# Altium PCB ELF 2 & ELF 2_Lite V1.3.PcbDoc (part 7 of 8)
Units mm, origin at the board's own origin, x right, y up, seen from the top; angles counter-clockwise.
Board outline 120 x 75 mm, 4 copper layers (01 TOP, 02 GND, 03 Signal, 04 BOT), stack 0.603 mm thick; 470 components, 412 nets, 2075 pads, 1565 vias.
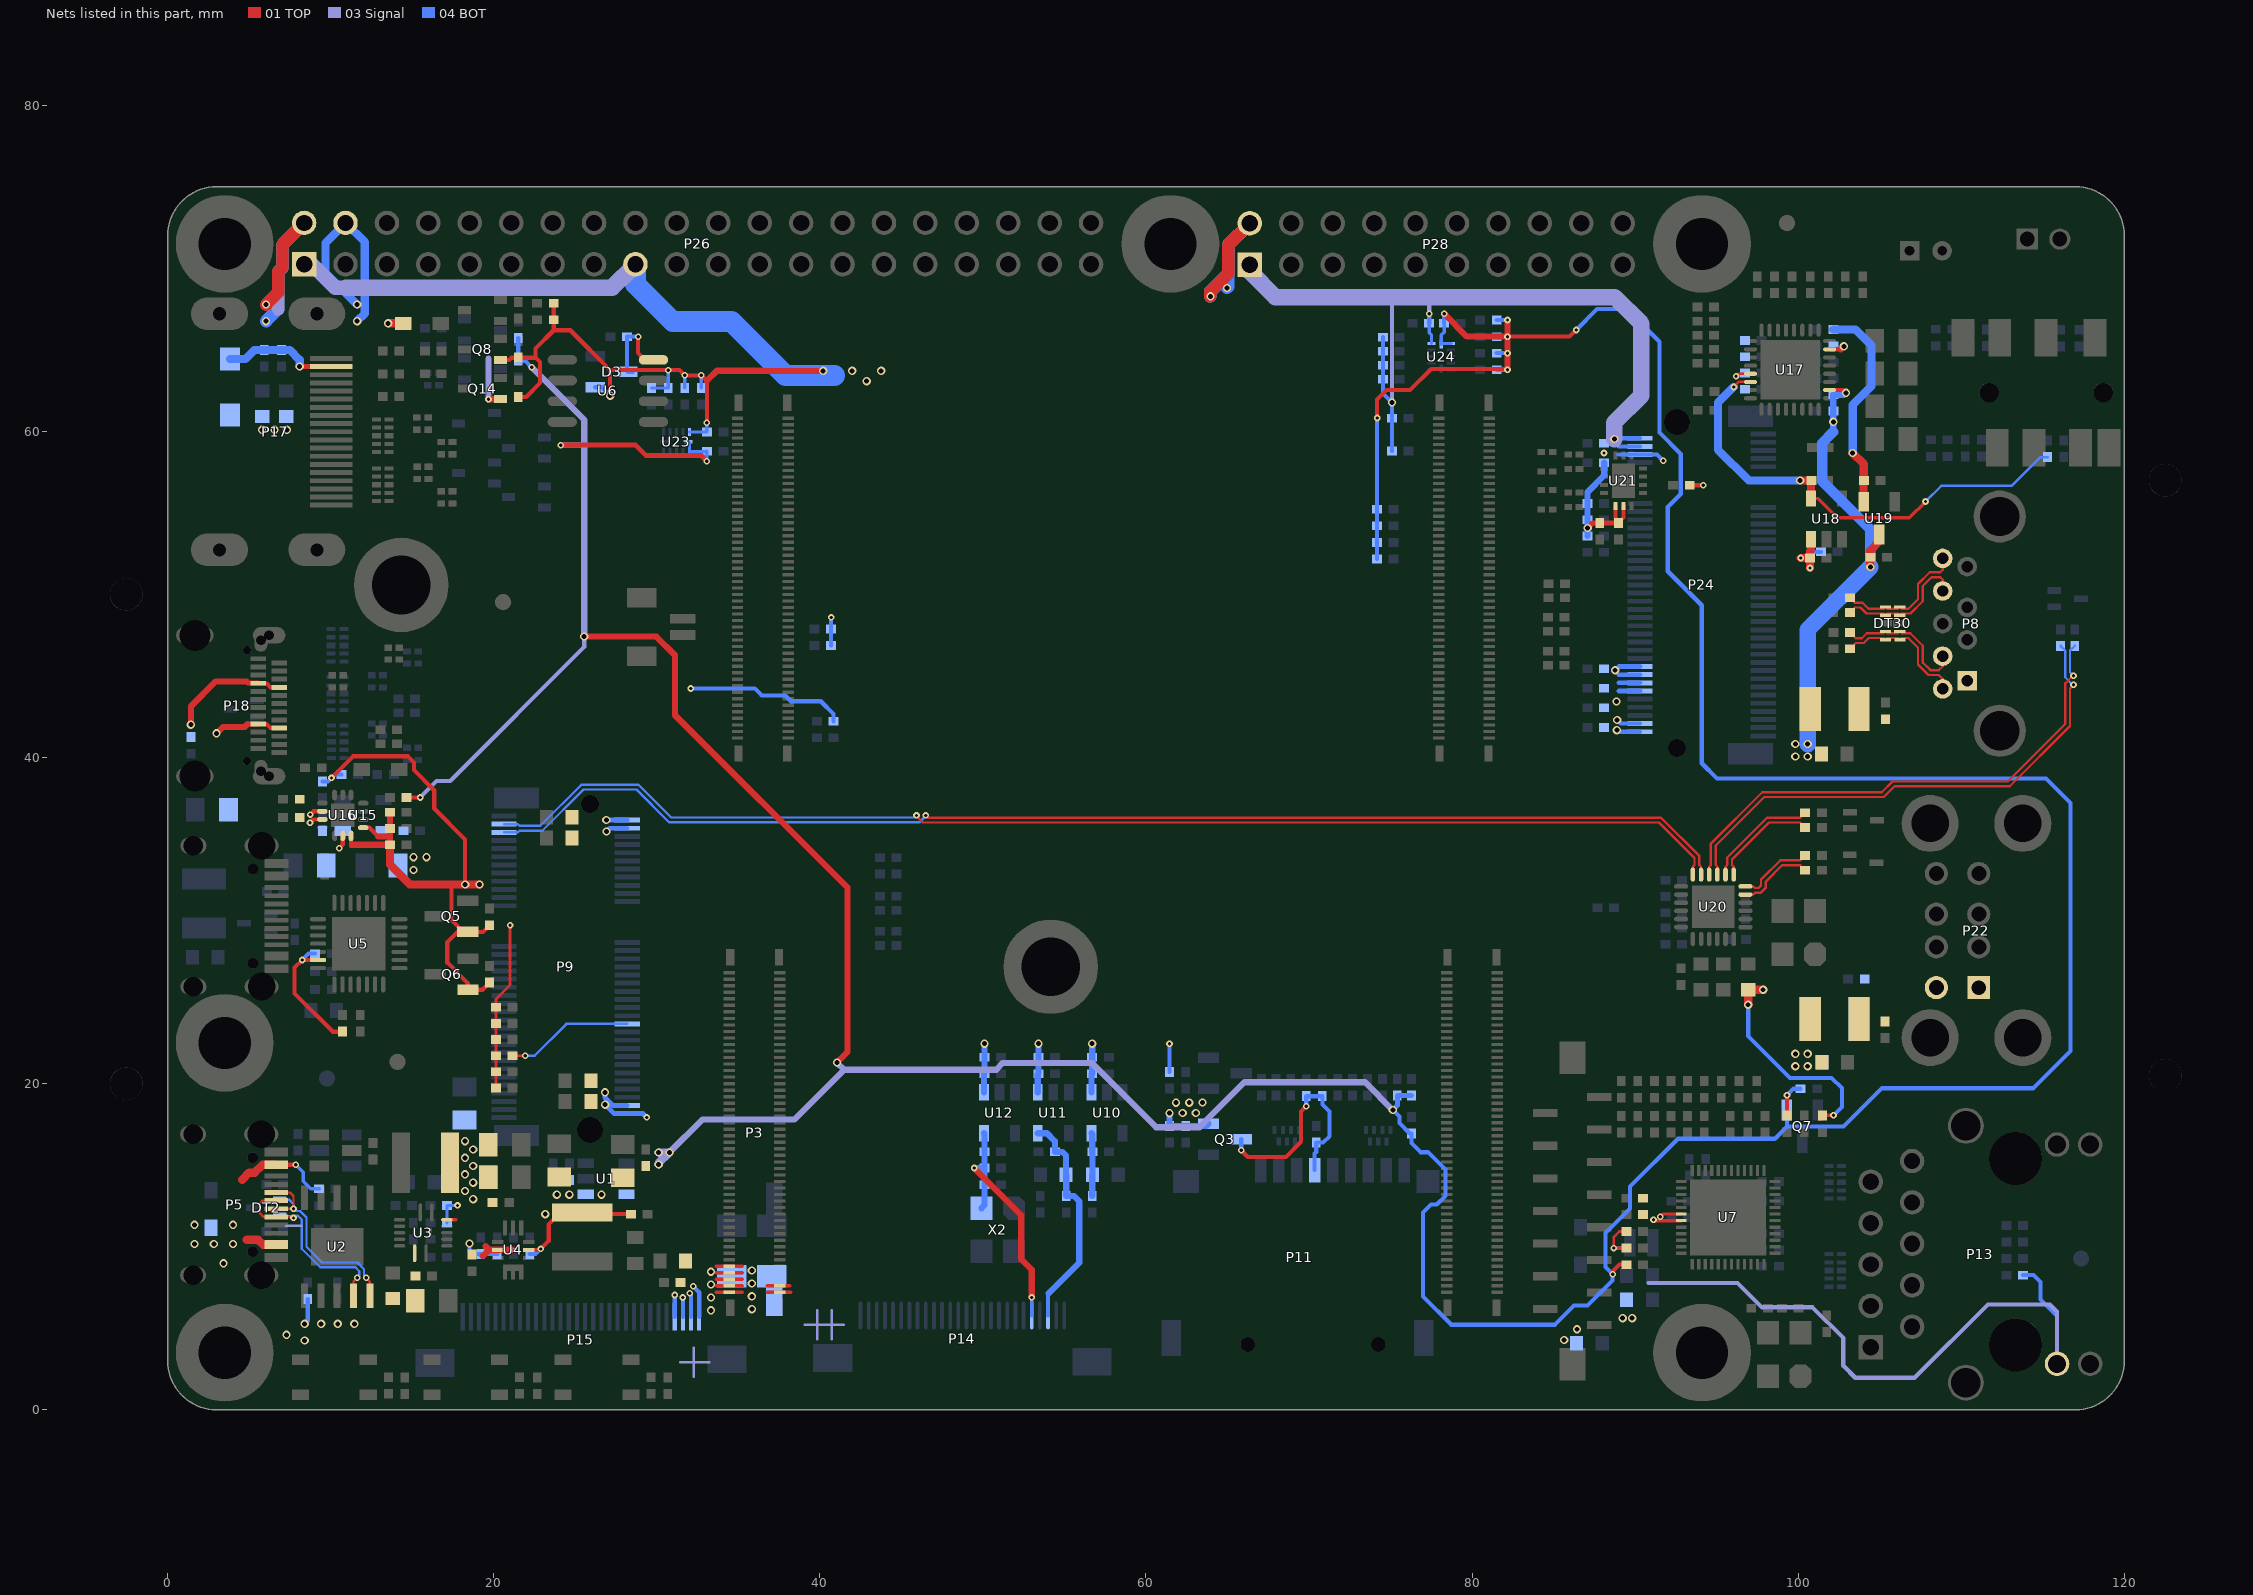
[diagram p8: the nets of this part, all layers, seen from the top]

## Via types
v1: diameter 0.406, hole 0.203, 01 TOP to 04 BOT, tented both sides, 1349 vias
v2: diameter 0.508, hole 0.305, 01 TOP to 04 BOT, tented both sides, 173 vias
v3: diameter 0.6, hole 0.3, 01 TOP to 04 BOT, tented both sides, 34 vias
v4: diameter 0.6, hole 0.3, 01 TOP to 04 BOT, 9 vias

## Nets (pads, with @x,y where several pads share a name; then routed paths per layer and width w, separated by ;. In a path a pad name is that pad's centre, name@x,y a point inside that pad or via, vN(x,y) a via of type N, cw(c..) or ccw(c..) an arc to the next point about the centre after c; other vN are vias at no path point) (continued)
USB3_SSRX_R_N: DT30.5 DT30.6 P8.5 R148.2 | length 8.4
  01 TOP w0.142: R148.2@103.163,49.792 103.466,49.489 103.944,49.489 104.313,49.121 105.241,49.121 DT30.6@105.343,49.224 105.446,49.121 106.122,49.121 DT30.5@106.224,49.224 106.327,49.121 106.766,49.121 107.345,49.701 107.345,50.642 108.061,51.357 108.7,51.357 108.86,51.517 P8.5@108.86,52.21
USB3_SSRX_R_P: DT30.4 DT30.7 P8.6 R152.2 | length 8.4
  01 TOP w0.142: R152.2@103.163,48.892 103.466,49.195 103.822,49.195 104.191,48.826 105.241,48.826 DT30.7@105.343,48.723 105.446,48.826 106.122,48.826 DT30.4@106.224,48.723 106.327,48.826 106.888,48.826 107.64,49.579 107.64,50.52 108.183,51.063 108.7,51.063 108.86,50.903 P8.6@108.86,50.21
USB3_SSTX_T_N: C132.2 DT30.2 DT30.9 P8.8 | length 8.4
  01 TOP w0.142: C132.2@103.168,47.665 103.521,47.312 103.891,47.312 104.2,47.621 105.241,47.621 DT30.9@105.343,47.724 105.446,47.621 106.122,47.621 DT30.2@106.224,47.723 106.327,47.621 106.867,47.621 107.64,46.848 107.64,45.82 108.103,45.357 108.62,45.357 108.86,45.597 P8.8@108.86,46.21
USB3_SSTX_T_P: C133.2 DT30.1 DT30.10 P8.9 | length 8.4
  01 TOP w0.142: C133.2@103.168,46.665 103.521,47.017 104.013,47.017 104.322,47.326 105.241,47.326 DT30.10@105.344,47.223 105.446,47.326 106.122,47.326 DT30.1@106.225,47.223 106.327,47.326 106.745,47.326 107.345,46.726 107.345,45.698 107.981,45.063 108.62,45.063 108.86,44.823 P8.9@108.86,44.21
USB22: DT26.2 F3.1 P22.1
USB23: DT27.2 F4.1 P22.5
USB30: DT31.2 F5.1 P8.1
USB_D1_N: P9.5 U20.11 | length 77.6
  01 TOP w0.142: v1(46.485,36.449) 46.622,36.311 91.579,36.311 93.935,33.955 93.935,33.403 94.038,33.301 U20.11@94.038,32.82
  04 BOT w0.142: P9.5@20.629,35.411 21.48,35.411 21.582,35.514 22.976,35.514 25.496,38.034 28.747,38.034 30.76,36.02 46.102,36.02 46.485,36.404 v1(46.485,36.449)
USB_D1_P: P9.3 U20.12 | length 77.2
  01 TOP w0.142: v1(45.926,36.449) 45.926,36.404 46.314,36.017 91.457,36.017 93.64,33.833 93.64,33.403 93.538,33.301 U20.12@93.538,32.82
  04 BOT w0.142: P9.3@20.629,35.911 21.48,35.911 21.582,35.809 22.854,35.809 25.374,38.328 28.869,38.328 30.882,36.315 45.793,36.315 v1(45.926,36.449)
USB_D2_N: R146.1 U20.9 | length 32
  01 TOP w0.142: U20.9@95.038,32.82 95.038,33.301 94.935,33.403 94.935,34.599 97.912,37.575 105.245,37.575 105.906,38.236 112.975,38.236 116.667,41.927 116.667,44.238 v1(116.883,44.454)
  04 BOT w0.142: R146.1@116.088,46.845 116.372,46.561 116.372,44.92 116.838,44.454 v1(116.883,44.454)
USB_D2_P: R147.1 U20.10 | length 32
  01 TOP w0.142: U20.10@94.538,32.82 94.538,33.301 94.64,33.403 94.64,34.721 97.79,37.87 105.123,37.87 105.783,38.53 112.853,38.53 116.372,42.049 116.372,44.547 116.838,45.013 v1(116.883,45.013)
  04 BOT w0.142: v1(116.883,45.013) 116.667,45.229 116.667,46.561 R147.1@116.951,46.845
USB_D3_N: R138.1 U20.7 | length 6.5
  01 TOP w0.142: U20.7@96.038,32.82 96.038,33.301 95.935,33.403 95.935,33.744 98.204,36.013 100.124,36.013 R138.1@100.426,35.71
USB_D3_P: R139.1 U20.8 | length 7
  01 TOP w0.142: U20.8@95.538,32.82 95.538,33.301 95.64,33.403 95.64,33.866 98.082,36.308 100.124,36.308 R139.1@100.426,36.61
USB_D4_N: R143.1 U20.5 | length 4.8
  01 TOP w0.142: U20.5@96.763,31.594 97.244,31.594 97.347,31.697 97.686,31.697 98.015,32.025 98.015,32.4 99.011,33.397 100.124,33.397 R143.1@100.426,33.094
USB_D4_P: R144.1 U20.6 | length 4.8
  01 TOP w0.142: U20.6@96.763,32.094 97.244,32.094 97.347,31.992 97.564,31.992 97.72,32.147 97.72,32.522 98.889,33.691 100.124,33.691 R144.1@100.426,33.994
USB_N: DT2.1 P5.A7 P5.B7 U2.5 | length 12.9
  01 TOP w0.142: P5.A7@6.658,12.325 7.714,12.325 v1(7.716,12.323) 7.716,13.117 7.509,13.325 P5.B7@6.658,13.325 ; v1(12.179,8.086) 12.4,7.865 U2.5@12.4,7
  04 BOT w0.142: DT2.1@6.878,12.887 7.437,12.887 7.716,12.607 v1(7.716,12.323) 7.848,12.191 8.118,12.191 8.517,11.792 8.517,9.996 9.485,9.028 11.638,9.028 12.047,8.618 12.047,8.218 v1(12.179,8.086)
USB_P: DT2.2 P5.A6 P5.B6 U2.4 | length 12.9
  01 TOP w0.142: P5.A6@6.658,12.825 5.826,12.825 5.659,12.658 5.659,12.046 5.88,11.825 P5.B6@6.658,11.825 7.655,11.825 v1(7.716,11.764) ; U2.4@11.4,7 11.4,7.865 v1(11.621,8.086)
  04 BOT w0.142: DT2.2@6.878,11.887 7.594,11.887 v1(7.716,11.764) 7.848,11.896 7.996,11.896 8.222,11.67 8.222,9.874 9.363,8.733 11.516,8.733 11.753,8.496 11.753,8.218 v1(11.621,8.086)
VBUS_TYPEC0: C79.2 C80.2 C81.2 DT17.2 P18.A4 P18.A9 P18.B4 P18.B9 U15.1 U16.2 | length 12.4
  01 TOP w0.254: P18.B4@5.545,42.055 6.07,42.055 6.32,41.805 P18.A9@6.845,41.805 ; P18.B9@5.545,44.555 5.568,44.532 6.088,44.532 6.315,44.305 P18.A4@6.845,44.305 ; v1(10.526,34.438) 10.744,34.656 U16.2@10.744,35.2
  01 TOP w0.305: 4.817,44.666 4.928,44.555 P18.B9@5.548,44.555 ; 4.913,42.055 P18.B4@5.548,42.055
  01 TOP w0.381: v2(1.427,42.011) 1.427,43.128 2.965,44.666 3.805,44.666 3.818,44.654 4.658,44.654 4.671,44.666 4.817,44.666 ; v2(3.004,41.479) 3.401,41.877 4.735,41.877 4.913,42.055
VCC1V2_CAM: C54.2 C59.2 FB4.1 U10.5 | length 3.9
  04 BOT w0.381: U10.5@56.659,16.963 56.709,16.913 C54.2@56.709,15.813 56.722,15.801 FB4.1@56.722,14.413 56.709,14.401 C59.2@56.709,13.113
VCC1V8_CAM: C50.2 C56.2 C62.2 P14.22 U12.5 X2.4 | length 15.8
  01 TOP w0.381: v1(49.459,14.822) 52.354,11.927 52.354,9.219 52.991,8.582 v1(52.991,6.889)
  04 BOT w0.229: P14.22@52.991,5.78 v1(52.991,6.889)
  04 BOT w0.381: v1(49.459,14.822) C56.2@50.094,14.822 ; X2.4@49.907,12.363 50.094,12.55 C50.2@50.094,13.806 C56.2@50.094,14.822 ; U12.5@50.059,16.963 50.101,16.921 C62.2@50.101,15.813 50.094,15.806 C56.2@50.094,14.822
VCC2V8_CAM: C57.2 C58.2 FB3.1 P14.24 U11.5 | length 13.9
  04 BOT w0.229: P14.24@53.991,5.78 53.991,7.101 54.032,7.141
  04 BOT w0.381: U11.5@53.359,16.963 53.929,16.963 54.417,16.475 C57.2@54.417,15.813 54.868,15.813 55.097,15.585 FB3.1@55.097,14.413 55.109,14.401 C58.2@55.109,13.113 55.574,13.113 55.911,12.777 55.911,9.02 54.032,7.141
VCC5V_HDMI_TX0: C76.2 D7.2 DT14.2 P17.18 | length 7.1
  01 TOP w0.305: v2(8.099,63.975) P17.18@10.038,63.975
  04 BOT w0.508: D7.2@3.826,64.44 4.771,64.44 5.315,64.984 C76.2@5.926,64.984 6.968,64.984 DT14.2@6.976,64.992 7.491,64.992 8.099,64.384 v2(8.099,63.975)
VCC12V_DCIN: C1.2 C2.2 C9.2 C10.2 C11.2 C141.1 DT1.2 P3.91 P3.93 P3.95 P3.97 P3.98 P3.99 P3.100 P5.A4/B9 P5.B4/A9 R16.1 R19.2 U3.1 | length 20.4
  01 TOP w0.203: 33.653,7.2 P3.99@34.45,7.2 35.247,7.2 ; 33.653,7.6 P3.97@34.45,7.6 35.247,7.6 ; 33.653,8 P3.95@34.45,8 35.247,8 ; 33.653,8.4 P3.93@34.45,8.4 35.247,8.4 ; 33.653,8.8 P3.91@34.45,8.8 35.247,8.8 ; 36.753,7.2 P3.100@37.55,7.2 38.21,7.2 ; 36.753,7.6 P3.98@37.55,7.6 38.154,7.6
  01 TOP w0.254: P5.A4/B9@6.658,15.025 v1(7.864,15.025)
  01 TOP w0.508: 4.58,14.113 5.005,14.538 5.337,14.538 5.825,15.025 P5.A4/B9@6.658,15.025 ; 4.847,10.424 5.556,10.424 5.855,10.125 P5.B4/A9@6.658,10.125
  04 BOT w0.203: v1(7.864,15.025) 8.322,14.567 8.322,14.014 8.788,13.547 R19.2@9.291,13.547
  04 BOT w0.254: v2(8.402,5.267) 8.598,5.462 R16.1@8.598,6.785
  other v2: 8.402,4.251 7.29,4.597 9.418,5.267 10.434,5.267 11.45,5.267 33.326,6.101 35.824,6.172 33.326,6.888 35.824,6.959 33.326,7.675 35.824,7.747 33.326,8.463 35.824,8.534 3.429,8.98 1.651,10.16 2.831,10.16 4.011,10.16 1.651,11.34 4.011,11.34
VCC_1V8: C6.2 C150.2 C152.2 Q7.1 R3.1 R4.1 R9.1 R10.1 R11.1 R12.1 R45.1 R70.1 R74.2 R75.1 R96.1 R97.1 R113.2 R182.1 R184.1 R186.1 R188.1 U1.5 U23.1 U23.12 U24.1 U24.12 | length 316.9
  01 TOP w0.254: R113.2@14.657,37.55 v1(15.489,37.55) ; v1(74.173,60.824) 74.173,61.951 74.757,62.535 76.2,62.535 77.495,63.83 82.118,63.83 v1(82.169,63.779) ; v1(82.169,65.811) 85.979,65.811 v1(86.385,66.218) ; v1(88.615,8.315) 88.615,8.478 89.036,8.899 R74.2@89.454,8.899 ; R70.1@99.306,18.052 99.306,19.285 v1(99.309,19.287)
  01 TOP w0.305: v1(24.105,59.157) 28.701,59.157 29.347,58.51 32.736,58.51 v1(33.071,58.175)
  01 TOP w0.381: v2(25.547,47.414) 29.976,47.414 31.115,46.275 31.115,42.596 41.7,32.01 41.7,21.947 v2(41.046,21.293) ; v1(78.283,67.212) 79.683,65.811 v1(82.169,65.811) ; v1(82.169,63.779) v1(82.169,64.795) v1(82.169,65.811) ; v1(82.169,66.827) v1(82.169,65.811)
  03 Signal w0.254: v1(15.489,37.55) 16.498,38.559 17.334,38.559 25.547,46.772 v2(25.547,47.414)
  03 Signal w0.305: v1(24.105,59.157) 25.547,59.157
  03 Signal w0.381: v1(22.323,63.928) 25.547,60.704 25.547,59.157 v2(25.547,47.414) ; v2(30.777,15.778) 32.798,17.799 38.433,17.799 41.487,20.853 ; v2(41.046,21.293) 41.487,20.853 ; v2(75.139,18.38) 73.434,20.086 66.037,20.086 63.277,17.325 60.616,17.325 56.674,21.268 51.226,21.268 50.811,20.853 41.487,20.853
  03 Signal w0.508: v2(30.117,15.041) 30.117,15.117 v2(30.777,15.778) v2(30.117,15.778)
  04 BOT w0.203: U23.12@31.953,59.36 32.003,59.31 U23.1@32.003,58.76 33.043,58.76 C150.2@33.071,58.788 v1(33.071,58.175) ; C152.2@78.283,66.624 78.283,66.082 78.111,65.911 U24.12@78.111,65.336 78.161,65.386 U24.1@78.711,65.386
  04 BOT w0.254: R96.1@21.501,65.718 R97.1@21.501,64.334 21.917,64.334 v1(22.323,63.928) ; R4.1@74.173,52.171 R3.1@74.173,53.187 R12.1@74.173,54.204 R11.1@74.173,55.22 v1(74.173,60.824) ; v2(75.139,18.38) 75.538,17.981 75.538,17.578 76.175,16.942 R10.1@76.276,16.942 76.276,16.36 76.841,15.795 77.298,15.795 78.363,14.73 78.363,13.12 77.832,12.589 77.477,12.589 76.982,12.094 76.982,6.955 78.721,5.216 85.075,5.216 86.244,6.384 87.066,6.384 88.615,7.934 v1(88.615,8.315) 88.184,8.746 88.184,10.852 89.682,12.351 89.682,13.687 92.616,16.62 98.563,16.62 99.306,17.364 ; C152.2@78.283,66.624 v1(78.283,67.212) ; R188.1@81.509,63.779 v1(82.169,63.779) ; R186.1@81.509,64.795 v1(82.169,64.795) ; R184.1@81.509,65.811 v1(82.169,65.811) ; R182.1@81.509,66.827 v1(82.169,66.827) ; v1(86.385,66.218) 87.663,67.495 89.49,67.495 91.49,65.495 91.49,59.921 92.792,58.619 92.792,56.165 91.995,55.368 91.995,51.423 94.082,49.337 94.082,39.649 95.025,38.706 115.192,38.706 116.693,37.205 116.693,21.998 114.414,19.719 105.125,19.719 102.77,17.364 99.306,17.364 ; R75.1@100.148,19.688 99.71,19.688 v1(99.309,19.287) 99.306,19.285 Q7.1@99.306,18.388 99.306,17.364
  04 BOT w0.305: v2(75.139,18.38) 75.413,18.654 R45.1@75.413,19.279 R9.1@76.276,19.279
VCC_1V8_CODEC: C98.2 C99.2 C100.2 C101.2 C116.2 R127.2 U17.13 U17.14 U18.5 | length 30.5
  01 TOP w0.156: v1(96.038,62.723) 96.348,63.032 U17.14@97.072,63.032 ; v1(96.186,63.383) 96.336,63.532 U17.13@97.072,63.532
  01 TOP w0.203: U18.5@100.778,55.882 101.215,55.882 102.402,54.695 106.802,54.695 v1(107.805,55.698)
  01 TOP w0.254: U18.5@100.775,55.879 U18.5@100.778,55.882
  01 TOP w0.508: v2(100.121,56.982) C116.2@100.82,56.982 100.778,56.94 U18.5@100.778,55.882
  04 BOT w0.156: v1(107.805,55.698) 108.77,56.663 113.089,56.663 114.846,58.421 R127.2@115.288,58.421
  04 BOT w0.508: v1(96.038,62.723) 95.082,61.767 95.082,58.864 96.965,56.982 v2(100.121,56.982)
VCC_3V3: C4.2 C5.2 C21.2 C23.2 C24.2 C25.2 C28.2 C36.2 C37.2 C53.2 C55.2 C61.2 C92.2 C93.2 C110.2 C115.2 C130.2 C131.2 C136.2 C137.2 C138.2 C139.2 C142.2 C143.2 C151.2 C153.2 D3.1 FB1.1 FB5.1 FB6.1 L2.2 P9.2 P9.4 P9.72 P9.74 P13.11 P24.2 P24.4 P24.12 P24.14 P24.16 P24.18 P24.70 P24.72 P24.74 P26.1 P26.17 P28.1 Q3.2 Q5.1 Q6.1 Q8.1 R1.1 R2.1 R5.1 R6.1 R7.1 R8.1 R13.2 R14.2 R15.1 R20.1 R28.1 R29.1 R33.1 R36.1 R47.1 R48.1 R52.2 R68.1 R69.1 R71.2 R78.1 R79.1 R80.1 R81.1 R83.1 R84.1 R94.1 R95.1 R101.1 R102.2 R114.2 R115.2 R125.1 R149.1 R150.1 R151.1 R155.1 R167.1 R180.2 R181.2 R183.2 R185.2 R187.2 R189.2 U1.1 U4.2 U7.30 U7.31 U10.1 U11.1 U12.1 U16.3 U16.4 U18.1 U21.12 U21.13 U23.11 U24.11 | length 296
  01 TOP w0.156: v1(88.692,9.915) 88.692,10.601 89.022,10.931 R69.1@89.454,10.931
  01 TOP w0.178: R20.1@20.137,19.73 R8.1@20.137,20.72 R7.1@20.137,21.711 R95.1@20.137,22.701 R155.1@20.137,23.692 20.137,25.18 21.001,26.044 v1(21.001,29.714)
  01 TOP w0.203: v1(88.692,9.915) R52.2@89.454,9.915 ; v1(91.122,11.646) 91.168,11.6 U7.31@92.824,11.6 ; v1(91.543,11.839) 91.704,12 U7.30@92.824,12 ; R68.1@101.49,18.052 v1(102.163,18.052)
  01 TOP w0.241: U21.12@88.781,55.422 88.781,54.688 88.976,54.493 C143.2@88.976,54.416 ; C143.2@88.976,54.381 C143.2@88.976,54.416 ; U21.13@89.281,55.422 89.281,54.721 C143.2@88.976,54.416
  01 TOP w0.254: v1(10.051,38.748) 11.376,40.073 14.732,40.073 15.108,39.697 15.108,39.233 16.352,37.989 16.352,36.865 18.246,34.97 v2(18.246,32.216) ; 11.244,34.579 U16.3@11.244,35.2 ; U16.4@11.994,35.7 12.364,35.7 12.914,35.15 ; 17.372,32.216 17.419,32.168 17.419,30.032 Q5.1@18.147,29.303 ; R48.1@19.743,26.196 19.305,25.758 Q6.1@18.415,25.758 18.415,26.153 17.153,27.415 17.153,28.673 17.783,29.303 Q5.1@18.147,29.303 ; R47.1@19.743,29.714 19.333,29.303 Q5.1@18.406,29.303 Q5.1@18.147,29.303 ; Q8.1@20.401,64.376 20.947,64.376 21.089,64.518 R81.1@21.501,64.518 22.566,64.518 ; R94.1@21.501,62.118 21.992,62.118 22.831,62.957 22.831,64.253 22.566,64.518 ; U4.2@22.135,9.8 22.816,9.8 v1(22.88,9.864) 23.371,10.355 23.371,11.365 24.106,12.1 L2.2@25.435,12.1 25.537,11.998 R28.1@28.417,11.998 ; R83.1@23.681,67.857 R83.1@23.681,67.857 R84.1@23.68,66.839 23.68,66.2 ; v2(27.14,62.192) 27.14,63.754 ; v1(33.071,60.528) 33.071,63.092 v1(32.727,63.436) v1(31.711,63.436) 31.393,63.754 v1(30.709,63.754) 27.14,63.754 ; C143.2@88.976,54.381 C143.2@89.002,54.381 ; R167.1@93.345,56.693 v1(94.183,56.693) ; 22.566,64.518 22.566,65.086 23.68,66.2 ; 23.68,66.2 24.694,66.2 27.14,63.754
  01 TOP w0.305: v2(87.084,54.08) 87.385,54.381 C142.2@87.833,54.381 C143.2@88.976,54.381
  01 TOP w0.381: 11.315,34.65 C92.2@13.641,34.65 13.641,35.15 ; 12.914,35.15 13.641,35.15 ; R114.2@13.641,36.65 C93.2@13.641,35.65 13.641,35.15 ; 33.071,63.092 33.691,63.712 v2(40.203,63.712)
  01 TOP w0.508: C92.2@13.641,34.65 13.641,33.429 14.854,32.216 17.372,32.216 v2(18.246,32.216) v2(19.121,32.216) ; v2(96.929,24.838) FB6.1@96.929,25.757 v2(97.848,25.757) ; v1(100.161,52.232) C115.2@100.72,52.232 ; v1(100.72,51.622) C115.2@100.72,52.232 ; U18.1@100.778,53.382 100.778,52.724 100.72,52.666 C115.2@100.72,52.232
  03 Signal w0.203: v1(88.692,9.915) 89.387,9.915
  03 Signal w0.254: v2(75.087,61.769) 75.087,68.238 ; v1(77.368,67.212) 77.368,68.204 ; 90.825,7.781 96.279,7.781 97.777,6.283 100.884,6.283 102.763,4.403 102.763,2.697 103.495,1.965 107.132,1.965 111.628,6.46 115.438,6.46 115.87,6.028 P13.11@115.87,2.815
  03 Signal w0.889: P26.1@8.37,70.243 8.851,70.243 10.279,68.816 10.917,68.816
  03 Signal w1.016: 10.917,68.816 27.263,68.816 P26.17@28.69,70.243 ; P28.1@66.37,70.217 66.37,69.798 67.93,68.238 75.087,68.238 88.747,68.238 90.376,66.609 90.376,62.199 88.717,60.54 v2(88.717,59.534)
  04 BOT w0.203: R181.2@29.679,62.662 R180.2@30.695,62.662 v1@30.695,63.741 ; R14.2@31.711,62.662 v1(31.711,63.436) ; U23.11@32.003,59.96 33.067,59.96 C151.2@33.071,59.956 v1(33.071,60.528) ; R13.2@32.727,62.662 v1(32.727,63.436) ; C153.2@77.368,66.624 77.368,66.034 77.511,65.891 U24.11@77.511,65.386
  04 BOT w0.254: R102.2@9.494,38.533 9.836,38.533 v1(10.051,38.748) 10.266,38.963 R101.1@10.673,38.963 ; R29.1@22.212,9.547 22.563,9.547 v1(22.88,9.864) ; D3.1@26.229,62.702 26.629,62.702 v2(27.14,62.192) ; R6.1@40.691,46.863 R5.1@40.691,47.879 v1(40.691,48.59) ; R36.1@61.441,20.708 v1(61.441,22.454) ; R183.2@74.539,65.78 R185.2@74.539,64.917 R187.2@74.539,64.053 R189.2@74.539,63.19 74.539,62.317 v2(75.087,61.769) R2.1@75.087,60.8 R1.1@75.087,58.8 ; C153.2@77.368,66.624 v1(77.368,67.212) ; v2(88.873,41.675) 88.969,41.58 P24.2@90.3,41.58 ; v2(88.895,42.3) 89.115,42.08 P24.4@90.3,42.08 ; 88.991,58.58 P24.70@90.3,58.58 91.331,58.58 v1(91.719,58.191) ; 88.991,59.08 P24.72@90.3,59.08 ; 88.991,59.58 P24.74@90.3,59.58 ; v2(96.929,24.838) 96.929,22.911 99.49,20.351 102.044,20.351 102.672,19.723 102.672,18.561 v1(102.163,18.052) ; v1(100.72,51.622) 100.72,52.35 100.978,52.609 R125.1@101.384,52.609 ; R71.2@113.792,8.255 114.427,8.255 114.846,7.836 114.846,6.765 115.87,5.741 P13.11@115.87,2.815
  04 BOT w0.292: 88.991,44.08 P24.12@90.3,44.08 ; 88.991,44.58 P24.14@90.3,44.58 ; 88.991,45.08 P24.16@90.3,45.08 ; 88.991,45.58 P24.18@90.3,45.58
  04 BOT w0.305: v2(26.817,19.465) 26.809,19.457 26.809,19.153 27.301,18.661 P9.72@28.179,18.661 ; v2(26.836,18.709) 27.384,18.161 P9.74@28.179,18.161 29.15,18.161 v1(29.383,17.929) ; v2(26.906,36.161) P9.2@28.179,36.161 ; v2(26.919,35.467) 27.113,35.661 P9.4@28.179,35.661
  04 BOT w0.381: U12.1@50.059,19.463 50.059,20.571 C61.2@50.101,20.613 R80.1@50.101,21.613 v2(50.101,22.45) ; U11.1@53.359,19.463 53.359,20.571 C55.2@53.401,20.613 R79.1@53.401,21.613 v2(53.401,22.45) ; U10.1@56.659,19.463 56.659,20.571 C53.2@56.701,20.613 R78.1@56.701,21.613 v2(56.701,22.45) ; v2(61.441,18.191) R33.1@61.441,17.408 C28.2@62.441,17.408 63.699,17.408 Q3.2@63.841,17.55 ; R149.1@87.084,53.58 v2(87.084,54.08) R150.1@87.084,54.58 R151.1@87.084,55.58 87.084,56.281 88.1,57.297 C131.2@88.1,58.08
  04 BOT w1.27: P26.17@28.69,70.243 28.69,69.026 30.979,66.736 34.576,66.736 37.888,63.424 40.894,63.424
  other v1: 88.087,58.674
  other v2: 85.644,4.276 86.431,4.936 89.232,5.614 89.816,5.614 23.16,11.998 23.871,13.191 24.633,13.191 26.614,13.191 62.25,18.195 63.059,18.199 61.844,18.83 62.653,18.834 63.462,18.838 88.851,43.428 88.769,45.35 42.87,63.077 41.981,63.712 43.759,63.712
VCC_3V3_CODEC: C96.2 C97.2 C118.2 U17.31 U19.2 | length 14
  01 TOP w0.254: U17.31@101.922,65.032 102.609,65.032
  01 TOP w0.381: 102.609,65.032 v2(102.791,65.215)
  01 TOP w0.508: v2(103.336,58.673) 104.02,57.99 C118.2@104.02,56.982 104.006,56.969 U19.2@104.006,55.677
  04 BOT w0.508: C96.2@102.149,66.247 103.508,66.247 104.49,65.265 104.49,62.772 103.336,61.618 v2(103.336,58.673)
VCC_3V3_SD: C29.2 C30.2 DT7.2 P11.4 Q3.3 | length 14.1
  01 TOP w0.254: v1(65.841,15.91) 66.24,15.511 68.583,15.511 69.508,16.436 69.508,18.301 v1(69.825,18.618)
  04 BOT w0.254: v1(65.841,15.91) Q3.3@65.841,16.6 ; v1(69.825,18.618) C30.2@69.825,19.228 C29.2@70.815,19.228 70.815,18.72 71.243,18.292 71.243,16.769 70.865,16.392 DT7.2@70.441,16.392 70.441,15.816 70.341,15.716 P11.4@70.341,14.701
VCC_5V: C3.2 C13.2 C14.2 C15.2 C16.2 C18.1 C22.2 C51.2 C52.2 C74.2 C75.2 C77.1 C78.1 C90.2 C91.2 C94.2 C95.2 C117.2 C125.2 C127.2 C129.2 D5.1 D7.1 F3.2 F4.2 F5.2 L1.2 P15.1 P15.2 P15.3 P15.4 P26.2 P26.4 P28.2 Q14.1 R22.2 R30.1 R31.1 R136.1 U3.7 U4.8 U15.5 U16.12 U16.13 U17.26 U19.3 | length 115
  01 TOP w0.198: U3.7@17.125,11.65 17.665,11.65
  01 TOP w0.254: v1(8.732,35.999) 8.933,36.2 U16.13@9.494,36.2 ; v1(8.74,36.5) 8.94,36.7 U16.12@9.494,36.7 ; U17.26@101.922,62.532 102.752,62.532 v2(102.924,62.361)
  01 TOP w0.381: 19.319,9.427 19.71,9.817 ; 19.502,10.025 19.71,9.817 ; v1(19.678,61.976) Q14.1@20.401,61.976 ; U4.8@21.306,9.817 19.71,9.817
  01 TOP w0.508: v2(13.529,66.626) D5.1@14.451,66.626 ; v2(104.42,51.681) C117.2@104.42,52.282 104.42,52.701 104.956,53.238 U19.3@104.956,53.677
  01 TOP w0.762: v2(6.04,67.776) 6.781,68.517 6.781,69.783 7.043,70.045 7.043,71.456 P26.2@8.37,72.783 ; v2(63.952,68.284) 63.952,68.576 65.033,69.657 65.033,71.42 P28.2@66.37,72.757
  03 Signal w0.156: 7.285,11.286 8.194,11.286 ; 31.44,2.904 32.261,2.904 ; 32.261,2.018 32.261,2.904 ; 32.261,3.796 32.261,2.904 ; 33.218,2.904 32.261,2.904 ; 39.074,5.224 39.836,5.222 ; 39.836,4.319 39.836,5.222 ; 39.836,6.097 39.836,5.222 ; 40.74,4.319 40.74,5.22 ; 40.74,6.097 40.74,5.22 ; 41.474,5.218 40.74,5.22 ; 39.836,5.222 40.74,5.22
  03 Signal w0.381: v1(19.678,61.976) 19.678,64.448
  03 Signal w0.762: 6.781,67.501 6.781,69.783 7.043,70.045 7.043,71.456 P26.2@8.37,72.783 ; v2(63.952,68.284) 63.952,68.576 65.033,69.657 65.033,71.42 P28.2@66.37,72.757
  04 BOT w0.198: R22.2@17.14,11.464 C16.2@17.14,12.531 v1(17.775,12.531)
  04 BOT w0.254: v2(18.511,10.194) 18.511,9.798 18.762,9.547 R31.1@19.212,9.547 R30.1@20.212,9.547 ; P15.4@31.1,5.7 v1(31.1,7.035) ; P15.3@31.6,5.7 v1(31.6,6.885) ; v1(32.019,7.148) 32.1,7.068 P15.2@32.1,5.7 ; v1(32.088,44.23) 36.01,44.23 36.439,43.801 37.877,43.801 38.228,43.45 40.054,43.45 40.838,42.665 R136.1@40.838,42.224 ; v1(32.227,7.578) 32.6,7.205 P15.1@32.6,5.7
  04 BOT w0.381: 102.149,59.964 v2(102.149,60.583) C94.2@102.149,61.247 C95.2@102.149,62.247 102.81,62.247 v2(102.924,62.361)
  04 BOT w0.508: v2(11.628,66.76) 12.09,67.222 12.09,71.603 P26.4@10.91,72.783 9.68,71.552 9.68,69.725 v2(11.628,67.776)
  04 BOT w0.635: 102.149,59.964 101.472,59.287 101.472,56.949 104.42,54.002 v2(104.42,51.681)
  04 BOT w0.762: v2(6.04,66.76) 6.781,67.501 6.781,69.783 7.043,70.045 7.043,71.456 P26.2@8.37,72.783 ; v2(64.968,68.792) 65.033,68.857 65.033,71.42 P28.2@66.37,72.757
  04 BOT w1.016: v2(100.579,40.827) 100.579,47.841 v2(104.42,51.681)
  other v2: 18.74,12.912 18.232,13.42 18.74,13.928 18.232,14.436 18.74,14.944 18.232,15.452 18.741,15.958 18.232,16.468 99.817,21.065 100.579,21.065 99.817,21.827 100.579,21.827 15.083,33.102 15.083,33.889 15.871,33.889 99.817,40.065 100.579,40.065 99.817,40.827 5.787,60.093 6.549,60.093 7.311,60.093
VCC_RTC: C35.1 D3.3 U6.8 | length 5.3
  01 TOP w0.254: v1(28.857,65.811) 28.857,64.819 29.286,64.389 U6.8@29.794,64.389
  04 BOT w0.254: D3.3@28.55,63.652 D3.3@28.229,63.652 28.169,63.713 C35.1@28.169,65.811 v1(28.857,65.811)
VDD: C34.2 R38.1 U5.6 | length 8.1
  01 TOP w0.254: U5.6@9.222,27.583 v1(8.26,27.583) 7.79,27.112 7.79,25.52 10.126,23.184 R38.1@10.72,23.184
  04 BOT w0.254: v1(8.26,27.583) 8.65,27.972 C34.2@9.049,27.972
WIFI&BT_RST: P9.52 R7.2 | length 7.8
  01 TOP w0.156: R7.2@21.153,21.711 v1(21.925,21.711)
  04 BOT w0.156: v1(21.925,21.711) 22.498,21.711 24.449,23.661 P9.52@28.179,23.661
pads on no net: DT9.3 DT9.5 DT9.6 DT10.3 DT10.6 M5.0 M6.0 M7.0 M8.0 M9.0 M10.0 M11.0 M12.0 M13.0 M14.0 P1.4 P1.6 P1.10 P1.12 P1.16 P1.18 P1.22 P1.24 P1.32 P1.47 P1.49 P1.53 P1.55 P1.56 P1.59 P1.60 P1.61 P1.64 P1.65 P1.67 P1.71 P1.73 P1.74 P1.77 P1.78 P1.79 P1.83 P1.85 P1.86 P1.88 P1.89 P1.91 P1.95 P1.97 P1.98 P1.101 P1.102 P1.103 P1.104 P2.10 P2.12 P2.16 P2.17 P2.18 P2.19 P2.21 P2.22 P2.23 P2.24 P2.25 P2.27 P2.28 P2.30 P2.34 P2.36 P2.37 P2.39 P2.40 P2.41 P2.42 P2.45 P2.47 P2.52 P2.54 P2.57 P2.58 P2.60 P2.63 P2.67 P2.83 P2.85 P2.101 P2.102 P2.103 P2.104 P3.4 P3.6 P3.8 P3.10 P3.14 P3.40 P3.42 P3.46 P3.48 P3.52 P3.54 P3.88 P3.101 P3.102 P3.103 P3.104 P4.2 P4.3 P4.6 P4.11 P4.15 P4.25 P4.53 P4.55 P4.57 P4.59 P4.61 P4.65 P4.66 P4.67 P4.68 P4.71 P4.72 P4.73 P4.74 P4.77 P4.78 P4.79 P4.80 P4.84 P4.86 P4.90 P4.92 P4.96 P4.98 P4.101 P4.102 P4.103 P4.104 P5.A8 P5.B8 P5.H1 P5.H2 P9.0 P9.6 P9.16 P9.20 P9.21 P9.23 P9.38 P9.40 P9.42 P9.44 P9.46 P9.48 P9.50 P9.58 P9.59 P9.60 P9.61 P9.62 P9.64 P9.65 P9.66 P9.67 P9.68 P9.70 P9.71 P9.73 P10.A8 P10.B8 P10.H1 P10.H2 P11. P13. P13.2 P13.SH1 P13.SH2 P18.H1 P18.H2 P21.4 P21.6 P21.8 P21.9 P24.0 P24.5 P24.6 P24.7 P24.8 P24.10 P24.11 P24.13 P24.17 P24.19 P24.20 P24.22 P24.23 P24.24 P24.25 P24.26 P24.28 P24.29 P24.30 P24.31 P24.32 P24.34 P24.35 P24.36 P24.37 P24.38 P24.40 P24.42 P24.44 P24.46 P24.48 P24.56 P24.58 P24.67 P24.68 P24.69 P24.76 P24.77 U1.4 U2.2 U2.3 U2.10 U3.3 U3.5 U3.6 U4.4 U4.7 U5.1 U5.2 U5.10 U5.11 U5.12 U5.13 U5.14 U5.15 U5.16 U5.17 U5.18 U5.19 U5.20 U5.21 U5.22 U5.23 U5.24 U5.27 U5.28 U6.1 U6.2 U6.3 U6.7 U7.33 U7.38 U7.39 U7.40 U7.41 U7.42 U7.43 U7.44 U10.4 U11.4 U12.4 U17.3 U17.6 U17.15 U17.19 U17.20 U17.21 U17.22 U18.4 U20.2 U20.19 U20.21 U20.22 U20.23 U20.24 U21.2 U21.3 U21.5 U21.6 U21.7 U21.14 X2.1

## Polygon pours and split planes (outlines as drawn)
GND on 01 TOP "NONET_L-01_P-001" (solid, remove dead copper, pour order 125): 117.46,75 cw(c117.46,72.46) 120,72.46 120,2.54 cw(c117.46,2.54) 117.46,0 2.54,0 cw(c2.54,2.54) 0,2.54 0,72.46 cw(c2.54,72.46) 2.54,75 4.724,75
VCC_3V3 on 01 TOP "NONET_L-01_P-001" (solid, remove dead copper, pour order 119): 26.512,20.786 27.186,20.113 27.186,18.513 26.792,18.119 25.56,18.119 25.395,18.284 25.395,20.583 25.598,20.786
VCC_3V3 on 01 TOP "NONET_L-01_P-001" (solid, remove dead copper, pour order 117): 27.332,36.509 27.491,36.349 27.491,35.354 27.325,35.188 26.017,35.188 25.281,34.451 24.379,34.451 24.277,34.553 24.277,36.763 24.404,36.89 25.179,36.89 25.56,36.509
VCC_5V on 01 TOP "NONET_L-01_P-001" (solid, remove dead copper, pour order 49): 9.053,36.787 8.46,37.38 8.46,37.7 8.38,37.78 7.82,37.78 7.74,37.7 7.74,35.979 7.984,35.735 8.842,35.735 9.053,35.946
GND on 01 TOP "NONET_L-01_P-001" (solid, remove dead copper, pour order 51): 14.356,34.391 14.356,35.915 15.042,35.915 15.321,36.194 16.362,36.194 16.464,36.093 16.464,35.077 16.312,34.924 15.143,34.924 14.991,34.772 14.991,34.391
USB30 on 01 TOP "NONET_L-01_P-001" (solid, remove dead copper, pour order 73): 108.515,42.655 109.62,43.76 109.62,45.36 109.808,45.548 111.072,45.548 111.24,45.38 111.24,43.28 109.13,41.17 103.335,41.17 102.814,41.69 102.814,44.383 102.992,44.56 104.49,44.56 104.694,44.357 104.694,42.884 104.922,42.655
VCC_3V3 on 01 TOP "NONET_L-01_P-001" (solid, remove dead copper, pour order 110): 85.631,5.838 85.631,6.498 85.872,6.74 89.86,6.74 90.317,6.283 90.317,5.403 90.003,5.089 89.073,5.089 88.438,5.724 87.015,5.724 86.812,5.521 86.812,4.132 86.652,3.971 85.22,3.971 83.789,2.54 72.241,2.54 60.625,14.157 60.625,18.957 60.877,19.209 63.718,19.209 64.028,18.899 64.028,16.773 65.781,15.02 68.168,15.02 77.668,5.521 85.313,5.521
VCC_3V3 on 01 TOP "NONET_L-01_P-001" (solid, remove dead copper, pour order 57): 90.165,11.642 90.386,11.421 92.264,11.421 92.351,11.509 92.351,12.108 91.577,12.108 91.079,12.605 91.079,13.014 90.841,13.252 90.165,13.252
GND on 01 TOP "NONET_L-01_P-001" (solid, remove dead copper, pour order 94): 102.723,21.953 104.263,21.953 104.821,21.396 104.821,20.227 104.744,20.151 102.687,20.151 102.585,20.253 102.585,21.815
VCC_5V on 01 TOP "NONET_L-01_P-001" (solid, remove dead copper, pour order 92): 99.563,20.583 99.385,20.761 99.385,25.561 99.563,25.739 101.442,25.739 101.671,25.51 101.671,20.734 101.52,20.583
GND on 01 TOP "NONET_L-01_P-001" (solid, remove dead copper, pour order 90): 102.723,40.952 104.263,40.952 104.821,40.395 104.821,39.226 104.744,39.15 102.687,39.15 102.585,39.252 102.585,40.814
GND on 01 TOP "NONET_L-01_P-001" (solid, remove dead copper, pour order 86): 29.332,9.381 29.764,9.813 30.602,9.813 30.754,9.661 30.754,7.045 30.369,6.659 28.345,6.659 28.163,6.841 28.163,9.381
VCC_5V on 01 TOP "NONET_L-01_P-001" (solid, remove dead copper, pour order 85): 31.897,10.067 32.481,9.483 32.481,7.172 31.973,6.664 31.135,6.664 30.856,6.943 30.856,7.095 31.161,7.4 31.161,9.788 31.44,10.067
VCC_5V on 01 TOP "NONET_L-01_P-001" (solid, remove dead copper, pour order 76): 99.563,39.582 99.385,39.76 99.385,44.56 99.563,44.738 101.442,44.738 101.671,44.51 101.671,39.734 101.52,39.582
USB23 on 01 TOP "NONET_L-01_P-001" (solid, remove dead copper, pour order 70): 109.189,27.136 109.342,26.984 109.342,24.901 109.164,24.723 106.954,24.723 105.76,23.529 105.024,23.529 104.44,22.945 104.44,22.513 104.389,22.462 103.093,22.462 103.017,22.539 103.017,25.333 104.821,27.136
HUB_3V3 on 01 TOP "NONET_L-01_P-001" (solid, remove dead copper, pour order 69): 97.387,26.925 97.387,28.017 97.209,28.195 92.865,28.195 92.561,27.89 92.561,26.773 93.17,26.773 93.323,26.925
GND on 01 TOP "NONET_L-01_P-001" (solid, remove dead copper, pour order 68): 95.87,26.458 96.023,26.305 96.023,24.952 95.863,24.791 92.18,24.791 92.035,24.936 92.035,26.305 92.187,26.458
GND on 01 TOP "NONET_L-01_P-001" (solid, remove dead copper, pour order 39): 29.497,15.528 29.624,15.655 29.624,16.976 28.824,17.776 21.648,17.776 20.95,17.078 20.95,13.344 20.62,13.014 20.62,12.429 20.696,12.353 22.347,12.353 22.868,12.874 22.868,15.122 23.274,15.528
VCC_1V8 on 01 TOP "NONET_L-01_P-001" (solid, remove dead copper, pour order 38): 29.814,16.03 29.897,16.112 30.957,16.112 31.059,16.011 31.059,15.376 30.295,14.611 30.21,14.525 29.091,14.525 29.002,14.614 29.002,15.217 29.052,15.268 29.681,15.268 29.814,15.401
VCC_3V3 on 01 TOP "NONET_L-01_P-001" (solid, remove dead copper, pour order 35): 22.86,11.675 23.298,11.237 27.137,11.237 27.3,11.401 27.3,12.963 27.617,13.293 28.519,13.293 28.684,13.458 28.684,15.008 28.544,15.147 23.591,15.147 23.109,14.665 23.109,12.747 22.86,12.498
VCC12V_DCIN on 01 TOP "01 TOP-VCC12V_DCIN" (solid, remove dead copper, pour order 34): 32.431,6.435 32.71,6.714 32.71,8.416 33.193,8.899 36.545,8.899 36.825,8.619 36.825,7.857 36.977,7.705 38.212,7.705 38.37,7.547 38.37,4.399 37.765,3.793 7.691,3.793 4.821,6.664 3.068,6.664 2.641,7.091 2.641,8.586 2.201,9.026 1.334,9.026 1.087,9.273 1.087,15.037 1.35,15.3 7.386,15.3 7.386,14.741 5.913,14.741 5.354,14.182 4.948,14.182 4.745,13.979 4.745,11.032 5.122,10.655 5.681,10.655 5.938,10.397 7.386,10.397 7.386,9.839 4.668,9.839 4.44,9.61 4.44,7.934 4.872,7.502 6.396,7.502 7.97,5.927 12.852,5.927 13.128,6.202 13.128,7.324 14.089,7.324 14.651,7.885 14.651,9.868 14.986,10.203 15.353,10.203 15.438,10.118 15.438,8.873 15.538,8.773 15.538,7.761 15.768,7.531 15.768,5.953 16.033,5.689 18.248,5.689 18.994,6.435
NetL2_1 on 01 TOP "NONET_L-01_P-001" (solid, remove dead copper, pour order 28): 27.579,10.042 27.579,8.282 22.964,8.282 22.135,9.111 22.135,9.267 22.325,9.458 23.109,9.458 23.693,10.042
GND on 01 TOP "01 TOP-GND" (solid, remove dead copper, pour order 27): 17.826,5.952 18.486,6.613 22.245,6.613 22.448,6.816 22.448,8.569 22.169,8.848 18.181,8.848 17.973,9.056 17.973,9.493 17.851,9.615 16.652,9.615 16.048,10.22 15.743,10.22 15.641,10.118 15.641,8.975 15.819,8.797 15.819,7.908 16.302,7.426 16.302,6.079 16.429,5.952
VCC_5V on 01 TOP "NONET_L-01_P-001" (solid, remove dead copper, pour order 22): 19.629,9.204 19.629,11.693 20.264,12.328 20.264,16.976 20.188,17.052 16.784,17.052 16.708,16.976 16.708,11.591 16.784,11.515 17.597,11.515 18.207,10.905 18.207,9.204
NetC8_1 on 01 TOP "NONET_L-01_P-001" (solid, remove dead copper, pour order 21): 15.54,17.128 15.692,16.976 15.692,13.928 16.47,13.15 16.47,10.591 16.352,10.474 14.955,10.474 14.854,10.575 14.854,11.845 13.635,13.064 13.635,17.001 13.762,17.128
GND on 04 BOT "NONET_L-01_P-001" (solid, remove dead copper, pour order 127): 117.46,75 cw(c117.46,72.46) 120,72.46 120,2.54 cw(c117.46,2.54) 117.46,0 2.54,0 cw(c2.54,2.54) 0,2.54 0,72.46 cw(c2.54,72.46) 2.54,75 4.724,75
VCC_3V3 on 04 BOT "NONET_L-01_P-001" (solid, remove dead copper, pour order 121): 39.802,62.884 40.068,62.618 43.263,62.618 44.094,63.449 44.094,63.906 43.908,64.093 41.624,64.093 40.065,64.093 39.802,63.83
VCC_3V3 on 04 BOT "NONET_L-01_P-001" (solid, remove dead copper, pour order 36): 26.855,13.585 26.944,13.496 26.944,12.747 26.855,12.658 26.03,12.658 24.938,11.566 22.969,11.566 22.86,11.675 22.86,12.498 23.109,12.747 23.109,14.488 24.898,14.488 24.937,14.449 24.937,13.585
GND on 04 BOT "NONET_L-01_P-001" (solid, remove dead copper, pour order 122): 6.873,30.59 6.06,31.403 5.126,31.403 4.17,32.359 4.018,32.511 4.018,34.188 4.145,34.315 8.26,34.315 8.26,32.664 8.565,32.359 11.257,32.359 11.536,32.638 11.536,36.016 11.46,36.093 6.05,36.093 4.882,37.261 4.882,39.623 5.563,40.305 7.477,40.305 8.311,39.471 8.311,37.557 9.064,36.804 11.409,36.804 11.486,36.88 11.486,37.845 11.409,37.921 10.241,37.921 10.114,38.048 10.114,38.379 10.224,38.489 11.807,38.489 11.943,38.353 11.943,36.626 12.425,36.144 12.425,34.594 12.654,34.365 12.654,32.638 13.518,31.775 15.321,31.775 15.651,32.105 15.651,34.746 15.169,35.229 15.169,35.863 15.525,36.22 16.718,36.22 17.368,35.569 17.368,32.501 15.458,30.59
VCC_5V on 04 BOT "NONET_L-01_P-001" (solid, remove dead copper, pour order 120): 99.563,39.582 100.833,39.582 101.1,39.849 101.1,40.966 100.871,41.195 99.703,41.195 99.385,40.877 99.385,39.76
GND on 04 BOT "NONET_L-01_P-001" (solid, remove dead copper, pour order 107): 20.95,15.668 22.868,15.668 22.868,12.874 22.347,12.353 21.077,12.353 20.95,12.48
GND on 04 BOT "NONET_L-01_P-001" (solid, remove dead copper, pour order 113): 9.746,24.091 9.926,23.91 13.152,23.91 13.302,24.06 13.302,29.984 13.175,30.111 9.898,30.111 9.746,29.958
VCC_5V on 04 BOT "NONET_L-01_P-001" (solid, remove dead copper, pour order 54): 7.794,59.94 7.642,59.788 3.374,59.788 3.222,59.94 3.222,61.236 3.298,61.312 7.743,61.312 7.794,61.261
GND on 04 BOT "NONET_L-01_P-001" (solid, remove dead copper, pour order 83): 101.442,60.948 101.247,60.752 100.059,60.752 99.842,60.969 99.842,61.798 99.655,61.985 97.658,61.985 97.455,62.188 97.455,66.506 97.632,66.684 101.265,66.684 101.442,66.506
VCC_1V8_CODEC on 04 BOT "NONET_L-01_P-001" (solid, remove dead copper, pour order 82): 95.477,65.544 95.829,65.896 97.048,65.896 97.048,62.238 95.477,62.238
VBUS_TYPEC0 on 04 BOT "04 BOT-VBUS_TYPEC0" (solid, remove dead copper, pour order 48): 6.603,35.31 3.59,35.31 3.288,35.612 3,35.9 3,39.168 2.628,39.54 2.425,39.54 2.037,39.928 2.037,40.741 1.834,40.944 1.148,40.944 1.046,41.046 1.046,42.214 1.148,42.316 2.519,42.316 3.307,41.528 3.307,40.653 4.893,39.067 4.893,38.704 5.407,38.19 7.19,38.19 7.88,37.5 7.88,36.287 8.379,35.788 11.257,35.788 11.257,34.543 10.292,33.578 10.292,32.638 9.149,32.638 9.149,34.01 8.86,34.299 7.615,34.299
VCC_5V on 04 BOT "NONET_L-01_P-001" (solid, remove dead copper, pour order 50): 14.814,35.101 15.642,34.273 15.997,34.273 16.175,34.096 16.175,33.682 15.012,32.587 13.543,32.587 13.431,32.699 13.431,34.198 12.73,34.899 12.73,35.796 14.78,35.796 14.814,35.761
GND on 04 BOT "NONET_L-01_P-001" (solid, remove dead copper, pour order 115): 35.098,11.947 37.791,11.947 37.965,11.773 37.965,9.663 37.703,9.401 33.609,9.401 33.243,9.767 33.243,11.684 33.504,11.945
NetFB5_2 on 04 BOT "NONET_L-01_P-001" (solid, remove dead copper, pour order 109): 89.564,3.412 89.488,3.336 87.481,3.336 87.405,3.412 87.405,4.555 87.481,4.631 89.462,4.631 89.564,4.529
VCC_3V3 on 04 BOT "NONET_L-01_P-001" (solid, remove dead copper, pour order 108): 85.136,4.657 85.796,5.317 86.761,5.317 86.939,5.14 86.939,3.59 86.787,3.438 85.313,3.438 85.136,3.616
VCC12V_DCIN on 04 BOT "NONET_L-01_P-001" (solid, remove dead copper, pour order 15): 37.748,8.899 37.96,8.687 37.96,6.553 36.343,4.936 33.624,4.936 33.063,5.498 33.063,8.659 33.303,8.899
GND on 04 BOT "NONET_L-01_P-001" (solid, remove dead copper, pour order 95): 102.723,21.953 104.263,21.953 104.821,21.396 104.821,20.227 104.744,20.151 102.687,20.151 102.585,20.253 102.585,21.815
VCC_5V on 04 BOT "NONET_L-01_P-001" (solid, remove dead copper, pour order 93): 99.563,20.583 99.385,20.761 99.385,25.561 99.563,25.739 101.442,25.739 101.671,25.51 101.671,20.734 101.52,20.583
NetC112_2 on 04 BOT "NONET_L-01_P-001" (solid, remove dead copper, pour order 81): 101.849,64.525 101.849,62.871 102.936,62.871 103.043,62.978 103.043,64.423 102.941,64.525
VCC_3V3_CODEC on 04 BOT "NONET_L-01_P-001" (solid, remove dead copper, pour order 80): 101.849,64.982 102.966,64.982 103.017,65.033 103.017,66.506 102.966,66.557 101.9,66.557 101.849,66.506
VCC_3V3 on 04 BOT "NONET_L-01_P-001" (solid, remove dead copper, pour order 79): 89.149,46.021 89.276,45.894 89.276,41.246 89.149,41.119 87.93,41.119 87.803,41.246 87.803,45.869 87.955,46.021
VCC_3V3 on 04 BOT "NONET_L-01_P-001" (solid, remove dead copper, pour order 78): 89.23,59.868 89.327,59.771 89.327,57.68 87.803,57.68 87.777,57.705 87.777,59.532 88.113,59.868
USB22 on 04 BOT "NONET_L-01_P-001" (solid, remove dead copper, pour order 71): 103.017,25.358 103.662,26.003 103.662,26.906 104.222,27.466 105.125,27.466 111.679,27.466 112.187,26.958 112.187,24.825 111.679,24.317 106.548,24.317 105.735,23.504 104.998,23.504 104.44,22.945 104.44,22.513 104.262,22.335 103.195,22.335 103.017,22.513
NetC126_2 on 04 BOT "NONET_L-01_P-001" (solid, remove dead copper, pour order 67): 97.514,30.405 97.641,30.278 97.641,28.703 97.514,28.576 96.472,28.576 96.421,28.627 96.421,30.354 96.472,30.405
NetL3_1 on 04 BOT "NONET_L-01_P-001" (solid, remove dead copper, pour order 66): 92.273,11.236 92.375,11.134 92.375,10.118 91.435,9.178 90.724,9.178 90.724,11.134 90.825,11.236
ETH0_DVDDL on 04 BOT "04 BOT-ETH0_DVDDL" (solid, remove dead copper, pour order 65): 94.586,14.921 94.661,14.995 94.661,16.006 94.396,16.27 92.941,16.27 90.163,13.492 90.163,12.326 89.073,11.236 89.073,7.603 90.038,7.603 90.038,10.976 91.079,12.018 91.079,13.136 92.864,14.921
ETH0_AVDDL on 04 BOT "NONET_L-01_P-001" (solid, remove dead copper, pour order 60): 92.197,9.585 91.46,8.848 90.622,8.848 90.52,8.746 90.52,7.73 90.597,7.654 91.613,7.654 92.514,8.556 96.02,8.556 96.988,7.587 98.421,7.587 99.131,8.297 99.131,9.077 98.496,9.077 98.496,8.518 98.293,8.315 97.305,8.315 97.064,8.556 97.064,9.416 96.896,9.585
VCC_3V3 on 04 BOT "NONET_L-01_P-001" (solid, remove dead copper, pour order 62): 90.042,7.304 90.118,7.228 90.118,5.449 89.936,5.267 89.022,5.267 88.92,5.368 88.92,7.222 89.002,7.304
ETH0_VDDIO_1.8V on 04 BOT "NONET_L-01_P-001" (solid, remove dead copper, pour order 63): 92.421,13.166 92.533,13.054 92.533,11.524 92.384,11.524 92.38,11.521 91.924,11.521 91.924,11.984 91.614,12.294 91.532,12.294 91.312,12.514 91.312,13.034 91.444,13.166
NetC38_2 on 04 BOT "NONET_L-01_P-001" (solid, remove dead copper, pour order 61): 96.362,6.689 98.852,6.689 99.918,7.756 99.918,9.813 99.664,10.067 98.496,10.067 98.496,9.508 99.106,9.508 99.309,9.305 99.309,8.173 98.509,7.373 96.898,7.373 95.931,8.34 92.679,8.34 91.638,7.299 90.647,7.299 90.52,7.172 90.52,6.232 90.647,6.105 91.689,6.105 93.086,7.502 95.55,7.502
VCC_1V8 on 04 BOT "NONET_L-01_P-001" (solid, remove dead copper, pour order 37): 29.103,15.477 29.103,14.855 28.481,14.233 27.605,14.233 27.389,14.017 27.389,12.709 27.465,12.633 28.316,12.633 31.059,15.376 31.059,16.011 30.957,16.112 29.738,16.112
VCC_5V on 04 BOT "NONET_L-01_P-001" (solid, remove dead copper, pour order 25): 16.886,12.175 16.835,12.226 16.835,17.84 17.419,18.424 19.035,18.424 19.439,18.02 19.439,16.011 20.378,15.071 20.378,12.544 20.01,12.175
VCC12V_DCIN on 04 BOT "04 BOT-VCC12V_DCIN" (solid, remove dead copper, pour order 8): 1.087,11.501 1.524,11.938 3.937,11.938 4.44,11.435 4.44,10.334 4.44,7.934 4.872,7.502 6.396,7.502 7.97,5.927 10.866,5.927 11.624,5.927 11.887,5.664 11.887,3.913 11.61,3.636 11.605,3.641 7.818,3.641 4.795,6.664 3.068,6.664 2.638,7.093 2.638,8.588 2.201,9.026 1.334,9.026 1.087,9.273
GND on 02 GND "NONET_L-01_P-001" (solid, remove dead copper, pour order 11): 117.46,75 cw(c117.46,72.46) 120,72.46 120,2.54 cw(c117.46,2.54) 117.46,0 2.54,0 cw(c2.54,2.54) 0,2.54 0,72.46 cw(c2.54,72.46) 2.54,75 4.724,75
GND on 03 Signal "NONET_L-01_P-001" (solid, remove dead copper, pour order 126): 117.46,75 cw(c117.46,72.46) 120,72.46 120,2.54 cw(c117.46,2.54) 117.46,0 2.54,0 cw(c2.54,2.54) 0,2.54 0,72.46 cw(c2.54,72.46) 2.54,75 4.724,75
VCC_3V3 on 03 Signal "NONET_L-01_P-001" (solid, remove dead copper, pour order 106): 86.831,58.586 86.831,41.129 85.589,39.887 68.188,39.887 66.512,38.21 48.636,38.21 45.512,41.335 45.512,62.489 43.908,64.093 40.065,64.093 39.802,63.83 39.802,61.587 40.294,61.095 40.294,40.762 40.294,35.66 38.933,34.299 30.449,34.299 28.138,36.61 26.989,36.61 22.975,32.597 18.089,32.597 17.708,32.216 17.708,31.521 25.81,23.419 25.81,20.884 23.109,18.182 23.109,12.747 22.86,12.498 22.86,11.675 23.298,11.237 24.609,11.237 26.133,12.761 28.013,12.761 29.535,14.284 29.535,15.858 35.428,21.751 57.004,21.751 60.995,17.734 63.621,17.734 63.992,18.104 63.992,18.863 64.028,18.899 64.028,18.901 72.466,27.34 89.07,27.34 89.768,26.649 92.948,26.649 94.099,25.498 95.918,25.498 96.261,25.155 96.261,25.1 96.917,24.444 98.318,24.444 98.75,24.875 98.75,27.34 96.653,29.436 93.564,29.436 93.137,29.863 93.137,36.305 92.1,37.342 92.1,53.955 94.39,56.244 98.712,56.244 99.798,55.158 99.784,51.514 100.033,51.266 100.998,51.266 101.201,51.469 101.201,55.686 98.458,58.429 92.578,58.429 91.138,59.868 88.113,59.868
VCC_5V on 03 Signal "NONET_L-01_P-001" (solid, remove dead copper, pour order 105): 11.198,61.138 9.623,59.563 5.156,59.563 4.841,59.878 4.841,67.3 5.698,68.157 24.807,68.157 28.575,64.389 33.426,64.389 37.194,68.157 62.873,68.157 63.876,69.16 65.222,69.16 65.374,69.008 65.374,67.003 63.329,64.957 38.033,64.957 32.659,59.583 32.659,43.646 27.634,38.62 22.372,33.359 17.978,33.359 16.835,32.216 16.835,20.38 20.239,16.976 20.239,12.404 19.883,12.048 19.883,6.417 20.6,5.7 30.375,5.7 30.754,6.079 30.754,7.222 31.44,7.908 32.431,7.908 32.862,7.476 32.862,6.025 33.34,5.547 35.96,5.547 36.545,6.132 36.545,10.861 37.436,11.751 37.436,16.02 41.834,20.418 56.573,20.418 60.167,16.824 63.509,16.824 66.252,19.567 78.033,19.567 78.454,19.988 78.454,22.948 81.17,25.663 92.61,25.663 93.726,24.547 95.269,24.547 96.337,23.478 99.034,23.478 102.687,27.131 102.687,29.524 99.131,33.08 99.131,40.636 99.69,41.195 101.498,41.195 102.363,40.315 102.363,34.499 105.844,30.975 105.854,17.4 104.694,16.239 101.977,16.239 101.418,15.681 90.057,15.681 88.184,13.813 88.184,8.162 81.123,1.102 17.071,1.102 11.763,6.41 9.164,6.41 5.837,9.737 5.837,13.039 6.726,13.928 6.726,35.188 8.758,37.22 16.651,37.22 26.005,46.53 26.005,60.765 22.918,63.852 13.912,63.852
GND on 03 Signal "NONET_L-01_P-001" (solid, remove dead copper, pour order 98): 17.351,38.951 8.508,38.951 7.466,37.909 5.19,37.909 2.321,40.778 2.321,45.459 3.306,46.444 6.023,46.444 8.153,48.574 16.733,48.574 19.739,45.542 19.739,41.339
VCC_3V3 on 03 Signal "NONET_L-01_P-001" (solid, remove dead copper, pour order 111): 91.615,12.226 91.892,11.949 91.892,11.286 91.435,10.829 91.435,6.059 90.007,4.631 88.472,4.631 87.456,3.616 85.618,3.616 85.136,4.098 85.136,4.657 86.812,6.333 87.295,6.333 89.073,8.111 89.073,11.134 90.165,12.226
GND on 03 Signal "NONET_L-01_P-001" (solid, remove dead copper, pour order 103): 98.623,56.041 99.41,55.254 99.41,50.91 99.08,50.58 95.048,50.58 92.349,53.279 92.349,53.899 94.491,56.041
GND on 03 Signal "NONET_L-01_P-001" (solid, remove dead copper, pour order 102): 83.358,14.563 83.951,13.969 83.951,8.019 82.316,6.384 78.024,6.384 77.439,6.968 77.439,9.839 82.164,14.563
GND on 03 Signal "NONET_L-01_P-001" (solid, remove dead copper, pour order 101): 92.146,24.266 94.61,21.802 94.61,19.812 93.654,18.856 84.12,18.856 83.662,19.313 83.662,22.335 85.593,24.266 87.244,24.266
GND on 03 Signal "NONET_L-01_P-001" (solid, remove dead copper, pour order 100): 52.834,16.239 53.157,15.916 53.157,12.48 53.64,11.998 57.17,11.998 57.399,11.769 57.399,10.49 51.235,4.327 42.54,4.327 42.26,4.606 42.26,13.826 44.673,16.239
GND on 03 Signal "NONET_L-01_P-001" (solid, remove dead copper, pour order 99): 30.665,6.688 30.665,7.464 31.846,8.645 32.939,8.645 34.183,9.889 34.183,15.985 33.904,16.265 31.897,16.265 28.151,12.518 26.347,12.518 20.416,6.587 20.416,6.365 20.628,6.154 30.131,6.154

## Keep-outs
Keep-Out Layer:
  lines w0.1: -5,0 -2,0 -2,3 0,3 ; -5,75 -2,75 -2,72 0,72 ; 0,7.112 -1.537,7.112 -1.537,18.038 0,18.038 ; 0,24.807 -1.537,24.807 -1.537,35.733 0,35.733 ; 0,37.711 -1.537,37.711 -1.537,48.638 0,48.638 ; 0,51.641 -1.537,51.641 -1.537,68.436 0,68.436 ; 120,5 122,5 122,0 125,0 ; 120,70 122,70 122,75 125,75
  lines w0.102: -5,0 -5,75 ; 0,72 0,82.5 ; 120,-7.5 120,3 ; 120,59 122.5,59 122.5,65.75 120,65.75 ; 125,0 125,75
  lines w0.127: 0,3 ccw(c3,3) 3,0 117,0 ccw(c117,3) 120,3 120,72 ccw(c117,72) 117,75 3,75 ccw(c3,72) 0,72 0,3
  lines w0.2: -2.263,79.998 -0.992,79.998 -0.763,80.227 -0.763,80.761 -1.001,80.998 -2.262,80.998 ; -2.262,75.503 -1.271,75.503 -0.763,76.011 -1.246,76.493 -2.262,76.493 ; -2.262,81.492 -2.262,82.524 ; -2.262,82.008 -0.792,82.008 ; -2.008,79.516 -2.262,79.262 -2.262,78.754 -2.008,78.5 -0.992,78.5 -0.763,78.729 -0.763,79.257 -1.022,79.515 ; -0.509,77.001 -0.509,78.017 ; 120.481,-3.024 120.481,-2.008 ; 120.764,-7.015 122.234,-7.015 ; 120.994,-4.521 120.735,-4.263 120.735,-3.735 120.964,-3.507 121.98,-3.507 122.234,-3.761 122.234,-4.269 121.98,-4.523 ; 122.234,-6.005 120.973,-6.005 120.735,-5.767 120.735,-5.234 120.964,-5.005 122.235,-5.005 ; 122.234,-1.5 121.218,-1.5 120.735,-1.017 121.243,-0.509 122.234,-0.509 ; 122.234,-7.531 122.234,-6.498

## Other copper
01 TOP:
  pour cut-out: 48.275,32.116 48.275,31.537 49.316,30.495 88.17,30.495 88.567,30.099 90.932,30.099 93.64,32.808 93.64,33.833 90.662,36.811 47.36,36.811 46.502,35.953 46.502,33.889
  pour cut-out: 53.463,65.426 57.206,65.426 57.206,65.752 57.126,65.833 53.544,65.833
  pour cut-out: 48.458,10.286 48.458,11.896 47.442,12.912 47.442,15.833 46.553,16.722 41.567,16.722 40.739,15.893 38.044,15.893 38.044,9.991 48.163,9.991
  pour cut-out: 76.894,41.653 76.195,40.954 76.195,39.836 76.716,39.315 77.731,39.315 77.731,41.405 77.483,41.653
  pour cut-out: 88.081,56.222 88.081,55.949 88.607,55.422 89.862,55.422 90.934,56.494 90.934,57.808 90.162,58.58 87.879,58.58 87.482,58.183 87.482,57.766 88.025,57.222
  pour cut-out: 25.319,64.389 25.319,63.119 25.176,63.119 25.169,63.126 25.169,64.357 25.198,64.386
  pour cut-out: 30.907,61.849 30.907,60.579 30.892,60.564 30.728,60.564 30.728,61.834 30.738,61.844
  pour cut-out: 52.566,59.219 52.258,58.911 52.258,58.46 62.278,58.46 62.278,59.757 61.74,59.219
  pour cut-out: 23.707,11.03 27.2,11.03 27.491,11.321 27.569,11.244 27.569,10.252 23.831,10.252 23.707,10.376
  pour cut-out: 98.933,48.514 98.933,47.879 99.568,47.879 99.568,48.514
  pour cut-out: 51.181,45.085 72.517,45.085 72.517,44.069 51.181,44.069
  pour cut-out: 68.453,50.292 76.708,50.292 77.343,50.927 77.343,58.42 76.2,58.42 68.453,50.673
  pour cut-out: 52.578,56.642 52.578,55.499 57.15,55.499 57.15,56.642
  pour cut-out: 19.248,28.711 19.248,28.076 19.858,28.076 19.858,28.711
  pour cut-out: 9.774,38.998 9.774,35.264 9.748,35.239 11.984,35.239 11.984,38.998
  pour cut-out: 97.988,14.944 98.877,14.055 98.877,9.483 97.988,8.594 93.416,8.594 92.527,9.483 92.527,14.055 93.416,14.944
  pour cut-out: 104.211,48.726 104.211,47.71 104.846,47.71 104.846,48.726
  pour cut-out: 101.29,56.6 103.068,56.6 103.068,57.489 101.29,57.489
  pour cut-out: 100.909,61.68 100.909,60.156 101.798,60.156 101.798,61.68
  pour cut-out: 101.163,59.648 101.163,58.251 103.957,58.251 103.957,59.648
  pour cut-out: 107.513,66.506 107.513,58.632 103.957,58.632 103.957,66.506
  pour cut-out: 104.465,68.03 104.465,70.57 97.353,70.57 96.972,70.189 96.972,68.03
  pour cut-out: 15.489,17.332 16.657,17.332 16.759,17.23 15.59,17.23
  pour cut-out: 16.327,41.462 15.59,40.725 15.59,40.649 16.251,39.988 17.216,39.988 17.673,40.446 17.673,41.462
  pour cut-out: 14.549,46.719 16.987,46.719 17.546,46.161 17.546,44.078 16.835,43.367 15.286,44.916 15.286,46.034
  pour cut-out: 33.142,23.961 34.183,23.961 35.352,25.129 35.352,28.152 35.047,28.457 33.269,28.457 33.142,28.33
  pour cut-out: 18.976,45.546 18.976,44.714 18.945,44.682 19.634,44.682 19.634,45.41 19.498,45.546
  pour cut-out: 37.55,23.2 39.406,23.2 40.076,23.87 40.076,31.543 37.5,28.967 37.5,27.75
  pour cut-out: 22.977,63.812 22.977,64.107 22.566,64.518 22.566,65.086 24.079,66.599 24.079,67.942 23.946,68.076 18.851,68.076 17.853,67.078 13.981,67.078 11.378,64.475 10.038,64.475 10.039,64.474 10.039,56.475 10.425,56.088 18.424,56.088 22.23,52.282 33.383,52.282 33.901,52.8 34.95,52.8 34.95,57.531 24.703,57.531 21.565,60.67 21.565,61.555 22.979,62.969
  pour cut-out: 10.222,31.097 10.222,31.083 8.536,29.396 8.536,27.769 10.222,26.082 13.223,26.082 14.223,27.082 14.223,30.083 13.223,31.083
  pour cut-out: 88.713,19.86 88.803,19.77 94.813,19.77 94.813,20.532 88.59,20.532
  pour cut-out: 11.3,15.9 13.212,15.9 13.279,15.833 13.279,14.182 13.025,13.928 10.612,13.928 9.977,14.563 9.977,15.325 10.358,15.706
  pour cut-out: 7.564,11.436 7.564,9.28 7.564,6.562 8.002,6.124 11.799,6.124 13.077,7.402 13.077,11.388 11.882,11.388
  pour cut-out: 11.628,13.928 13.152,13.928 13.152,12.404 11.628,12.404
  pour cut-out: 93.543,32.851 92.781,32.089 92.781,29.549 93.543,28.787 96.083,28.787 96.845,29.549 96.845,32.089 96.083,32.851
  pour cut-out: 97.48,67.268 97.48,62.188 97.988,61.68 101.544,61.68 101.798,61.934 101.798,66.887 101.417,67.268
  pour cut-out: 28.265,10.118 27.63,9.483 27.63,9.61 28.138,10.118
  pour cut-out: 76.779,42.884 76.779,41.868 77.541,41.868 77.541,42.884
  pour cut-out: 83.637,18.119 83.637,17.357 83.764,17.357 83.764,18.119
  pour cut-out: 83.764,14.436 83.764,12.404 85.415,12.404 85.415,14.436
  pour cut-out: 34.531,41.004 35.369,41.004 35.369,62.254 34.531,62.254
  pour cut-out: 37.631,41.004 38.469,41.004 38.469,62.254 37.631,62.254
  pour cut-out: 77.531,41.004 78.369,41.004 78.369,62.254 77.531,62.254
  pour cut-out: 80.631,41.004 81.469,41.004 81.469,62.254 80.631,62.254
  pour cut-out: 78.031,7.004 78.869,7.004 78.869,28.254 78.031,28.254
  pour cut-out: 81.131,7.004 81.969,7.004 81.969,28.254 81.131,28.254
  pour cut-out: 37.131,7.004 37.969,7.004 37.969,28.254 37.131,28.254
  pour cut-out: 34.031,7.004 34.869,7.004 34.869,28.254 34.031,28.254
03 Signal:
  pour cut-out: 27.121,38.034 27.121,36.727 27.094,36.699 27.024,36.769 27.024,37.796
  pour cut-out: 16.891,30.988 18.034,30.988 17.648,31.374 16.896,31.374 16.891,31.369
  pour cut-out: 33.015,18.094 32.989,18.119 32.989,19.135